# Altium PCB Control_Board-v1.0.PcbDoc (part 2 of 3)
Units mil, origin at the board's own origin, x right, y up, seen from the top; angles counter-clockwise.
Board outline 6234.87 x 2703.42 mil, 2 copper layers (Top Layer, Bottom Layer), stack 57 mil thick; 64 components, 54 nets, 227 pads, 139 vias.
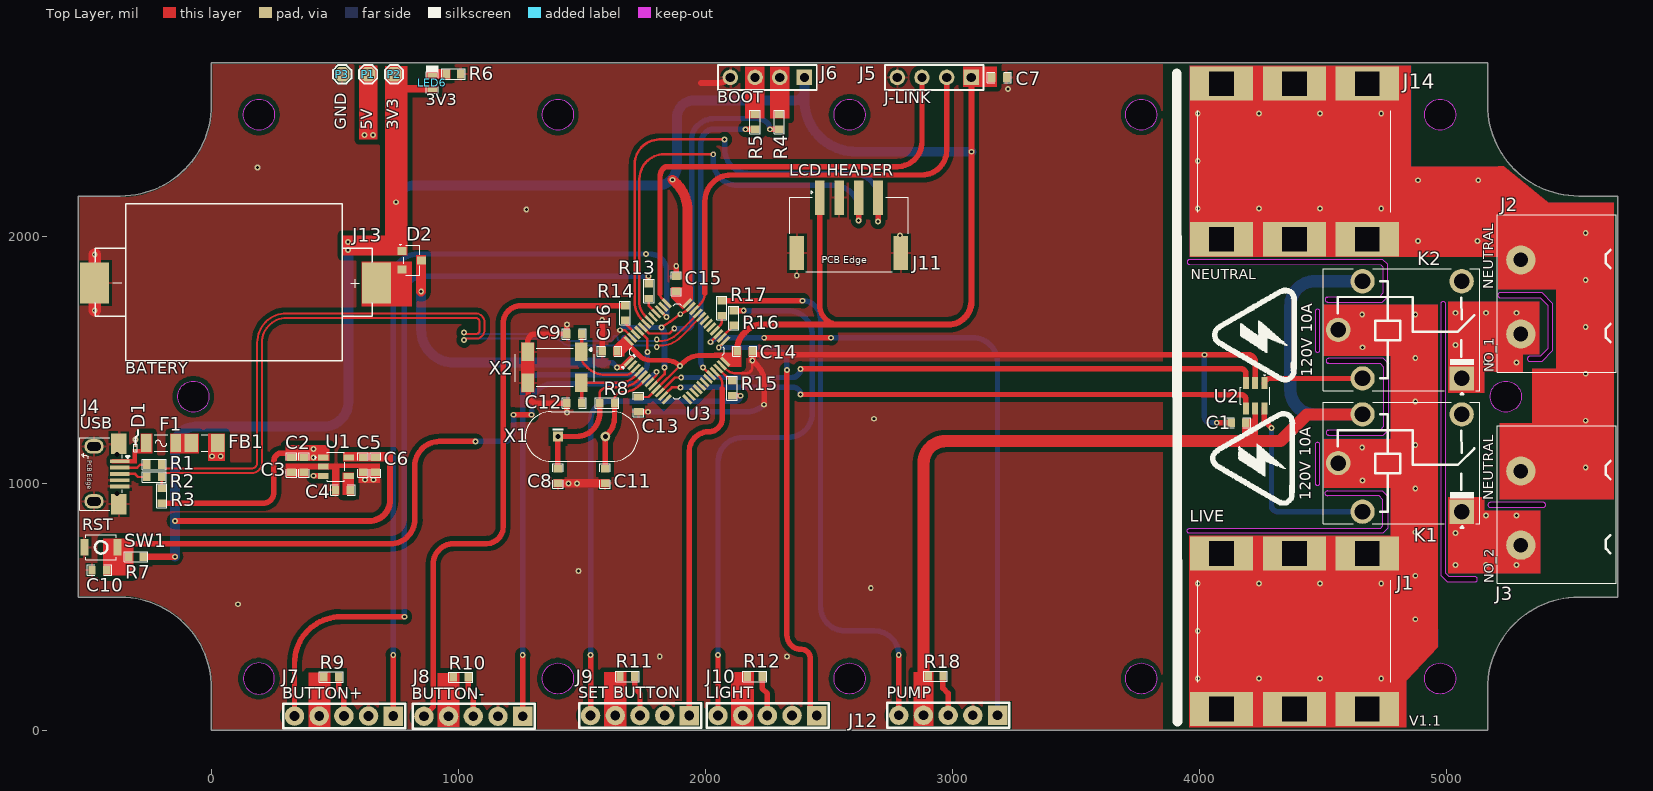
[diagram p0: Top Layer view]

## Via types
v1: diameter 23.62, hole 11.81, Top Layer to Bottom Layer, tented both sides, 131 vias
v2: diameter 23.62, hole 11.81, Top Layer to Bottom Layer, 8 vias

## Nets (pads, with @x,y where several pads share a name; then routed paths per layer and width w, separated by ;. In a path a pad name is that pad's centre, name@x,y a point inside that pad or via, vN(x,y) a via of type N, cw(c..) or ccw(c..) an arc to the next point about the centre after c; other vN are vias at no path point) (continued)
GND: (continued)
  Top Layer w22: X2.3@1280.97,1407.18 cw(c1275.49,1401.7) 1283.23,1401.7 1283.23,1360.17 ccw(c1318.23,1360.17) 1318.23,1325.17 C12.1@1439.23,1325.17 v1(1439.23,1287.17) ; X2.2@1280.97,1533.16 1281.23,1533.43 1281.23,1575.17 cw(c1311.23,1575.17) 1311.23,1605.17 C9.1@1439.23,1605.17 v1(1439.23,1643.17) ; C16.1@1582.23,1535.17 v1(1582.23,1662.17) ; C13.1@1729.23,1290.17 v1(1768.23,1290.17) ; v1(1882,1881) 1882.12,1880.88 1882.12,1843.12 1882.23,1843 C15.1@1882.23,1839.17 ; v1(2190.23,1498.17) 2208.71,1479.69 cw(c2138,1408.98) 2238,1408.98 v1(2238,1319) ; C14.1@2190.23,1521.17 v1(4021.23,1521.17) 4199.83,1521.17 cw(c4199.83,1494.4) 4226.6,1494.4 U2.2@4226.6,1406.15 ; v2(4071,1246) C1.1@4129,1246
  Top Layer w25: 1982.23,2621.17 2045.71,2621.17 ccw(c2045.71,2699.69) J6.4@2101.23,2644.17
  Top Layer w50: v1(-473,1701) v1(-473,1927)
  Bottom Layer w20: v1(1653.73,1620.67) cw(c1679.08,1595.32) 1679.08,1631.17 v1(1822.23,1631.17)
  Bottom Layer w22: v1(1768.23,1290.17) 2168.39,1290.17 ccw(c2168.39,1388.61) v1(2238,1319) ; v1(4021.23,1521.17) 4021.23,1282 4021,1282 4021,1268 ccw(c4043,1268) 4043,1246 v2(4071,1246)
  Bottom Layer w25: v1(1822.23,1631.17) cw(c1791.41,1600.35) 1835,1600.35 v1(1835,1470)
  other v1: 1815.23,299.17 2331.23,299.17 107,511 2670,576 1486,645 1445.23,1000.17 1480.23,1000.17 621.23,1015.17 656.23,1015.17 2683,1262 2370,1842 2788,2004 1275,2109 186,2279 3226,2597
LATCH_1: J7.1 U3.39 | length 3201.2
  Top Layer w10: U3.39@1815.64,1702.2 1815.64,1701.98 1843.23,1674.39 v1(1843.23,1674.17)
  Top Layer w22: J7.1@736.23,58.17 v1(736.23,305.17)
  Bottom Layer w22: v1(736.23,305.17) 736.23,1831.17 cw(c834.23,1831.17) 834.23,1929.17 1775.23,1929.17 cw(c1775.23,1861.17) 1843.23,1861.17 v1(1843.23,1674.17)
  other v1: 1760.23,1929.17
LATCH_2: J8.1 U3.45 | length 2036.5
  Top Layer w10: U3.45@1732.12,1618.68 1732.12,1618.52 1765.23,1585.41 v1(1765.23,1532.17) v1@1765.23,1526.17
  Top Layer w22: J8.1@1260.23,57.17 v1@1260.23,303.17
  Bottom Layer w22: v1@1260.23,303.17 v1(1260.23,305.17) 1260.23,1370.12 cw(c1330.47,1370.12) 1330.47,1440.36 1717.66,1440.36 ccw(c1717.66,1487.93) 1765.23,1487.93 v1(1765.23,1532.17) v1@1765.23,1533
LATCH_3: J9.1 U3.21 | length 1478.9
  Top Layer w10: U3.21@2038.35,1451.65 2056.79,1433.21 cw(c2026.75,1403.17) 2069.23,1403.17 2069.23,1384.17
  Top Layer w22: J9.1@1935.23,60.17 1935.23,1132.17 cw(c2012.23,1132.17) 2012.23,1209.17 ccw(c2012.23,1266.17) 2069.23,1266.17 2069.23,1384.17
LATCH_4: J10.1 U3.25 | length 1838
  Top Layer w10: v1(2054.25,1550.61) 2054.25,1550.84 2080.11,1576.69 U3.25@2080.11,1576.93
  Top Layer w22: v1@2330.23,1458.98 2330.23,1421.39 2330.23,386.17 ccw(c2388.23,386.17) 2388.23,328.17 cw(c2388.23,290.97) 2425.43,290.97 2425.43,88.54 J10.1@2451.23,60.17
  Bottom Layer w22: v1(2054.25,1550.61) 2263.23,1550.61 cw(c2263.23,1483.61) 2280.1,1548.45 cw(c2263.23,1483.61) 2328.07,1500.48 cw(c2263.23,1483.61) 2330.23,1483.61 v1(2330.23,1459.98)
LATCH_5: J12.1 U3.27 | length 2713.8
  Top Layer w10: v1(2021.23,1572.17) 2021.23,1572.95 2052.27,1603.98 U3.27@2052.27,1604.76
  Top Layer w22: v1(2238.23,1590.17) v1(2508.23,1590.17)
  Bottom Layer w22: v1@2021,1573 cw(c2062.45,1531.55) 2028.16,1579.09 cw(c2062.45,1531.55) 2062.45,1590.17 v1(2238.23,1590.17) ; v1(2021.23,1572.17) v1@2021.53,1572.47 ; v1(2508.23,1590.17) 3083.23,1590.17 cw(c3083.23,1490.17) 3183.23,1490.17 ; J12.1@3183.23,61.17 3183.23,1505.17
LED1_LAT: J7.5 R13.2 | length 3131.7
  Top Layer w22: J7.5@336.23,58.17 336.23,272.17 cw(c524.23,272.17) 524.23,460.17 v1(781.23,460.17) ; v1(1769.23,1839.17) 1769.54,1838.86 1769.54,1810.86 R13.2@1771.23,1809.17
  Bottom Layer w22: v1(781.23,460.17) 781.23,1763.57 cw(c856.84,1763.57) 856.84,1839.17 v1(1769.23,1839.17)
LED2_LAT: J8.5 R14.2 | length 2360.2
  Top Layer w22: J8.5@860.23,57.17 897.89,94.83 897.89,673.07 cw(c980.99,673.07) 980.99,756.17 1113.23,756.17 ccw(c1113.23,824.17) 1181.23,824.17 1181.23,1648.17 cw(c1253.23,1648.17) 1253.23,1720.17 R14.2@1675.23,1720.17
LED3_LAT: J9.5 R15.2 | length 1897.1
  Top Layer w22: J9.5@1535.23,60.17 v1(1535.23,305.17) ; R15.2@2104.23,1355.17 R15.2@2108.23,1355.17 v1(2142.23,1355.17)
  Bottom Layer w22: v1(1535.23,305.17) 1535.23,1255.17 cw(c1613.23,1255.17) 1613.23,1333.17 2120.23,1333.17 ccw(c2120.23,1355.17) v1(2142.23,1355.17)
LED4_LAT: J10.5 R16.2 | length 2211.2
  Top Layer w22: J10.5@2051.23,60.17 v1(2051.23,305.17) ; R16.2@2115.23,1700.17 v1(2155.23,1700.17)
  Bottom Layer w22: v1(2051.23,305.17) 2051.23,1086.17 cw(c2151.23,1086.17) 2151.23,1186.17 2333.23,1186.17 ccw(c2333.23,1286.17) 2433.23,1286.17 2433.23,1600.17 ccw(c2333.23,1600.17) 2333.23,1700.17 v1(2155.23,1700.17)